# Altium PCB Analizador_PCB.PcbDoc (part 2 of 2)
Units mil, origin at the board's own origin, x right, y up, seen from the top; angles counter-clockwise.
Board outline 3920 x 3040 mil, 2 copper layers (Top Layer, Bottom Layer); 151 components, 106 nets, 476 pads, 730 vias.
Unrouted connection lines stored in the file: 111.
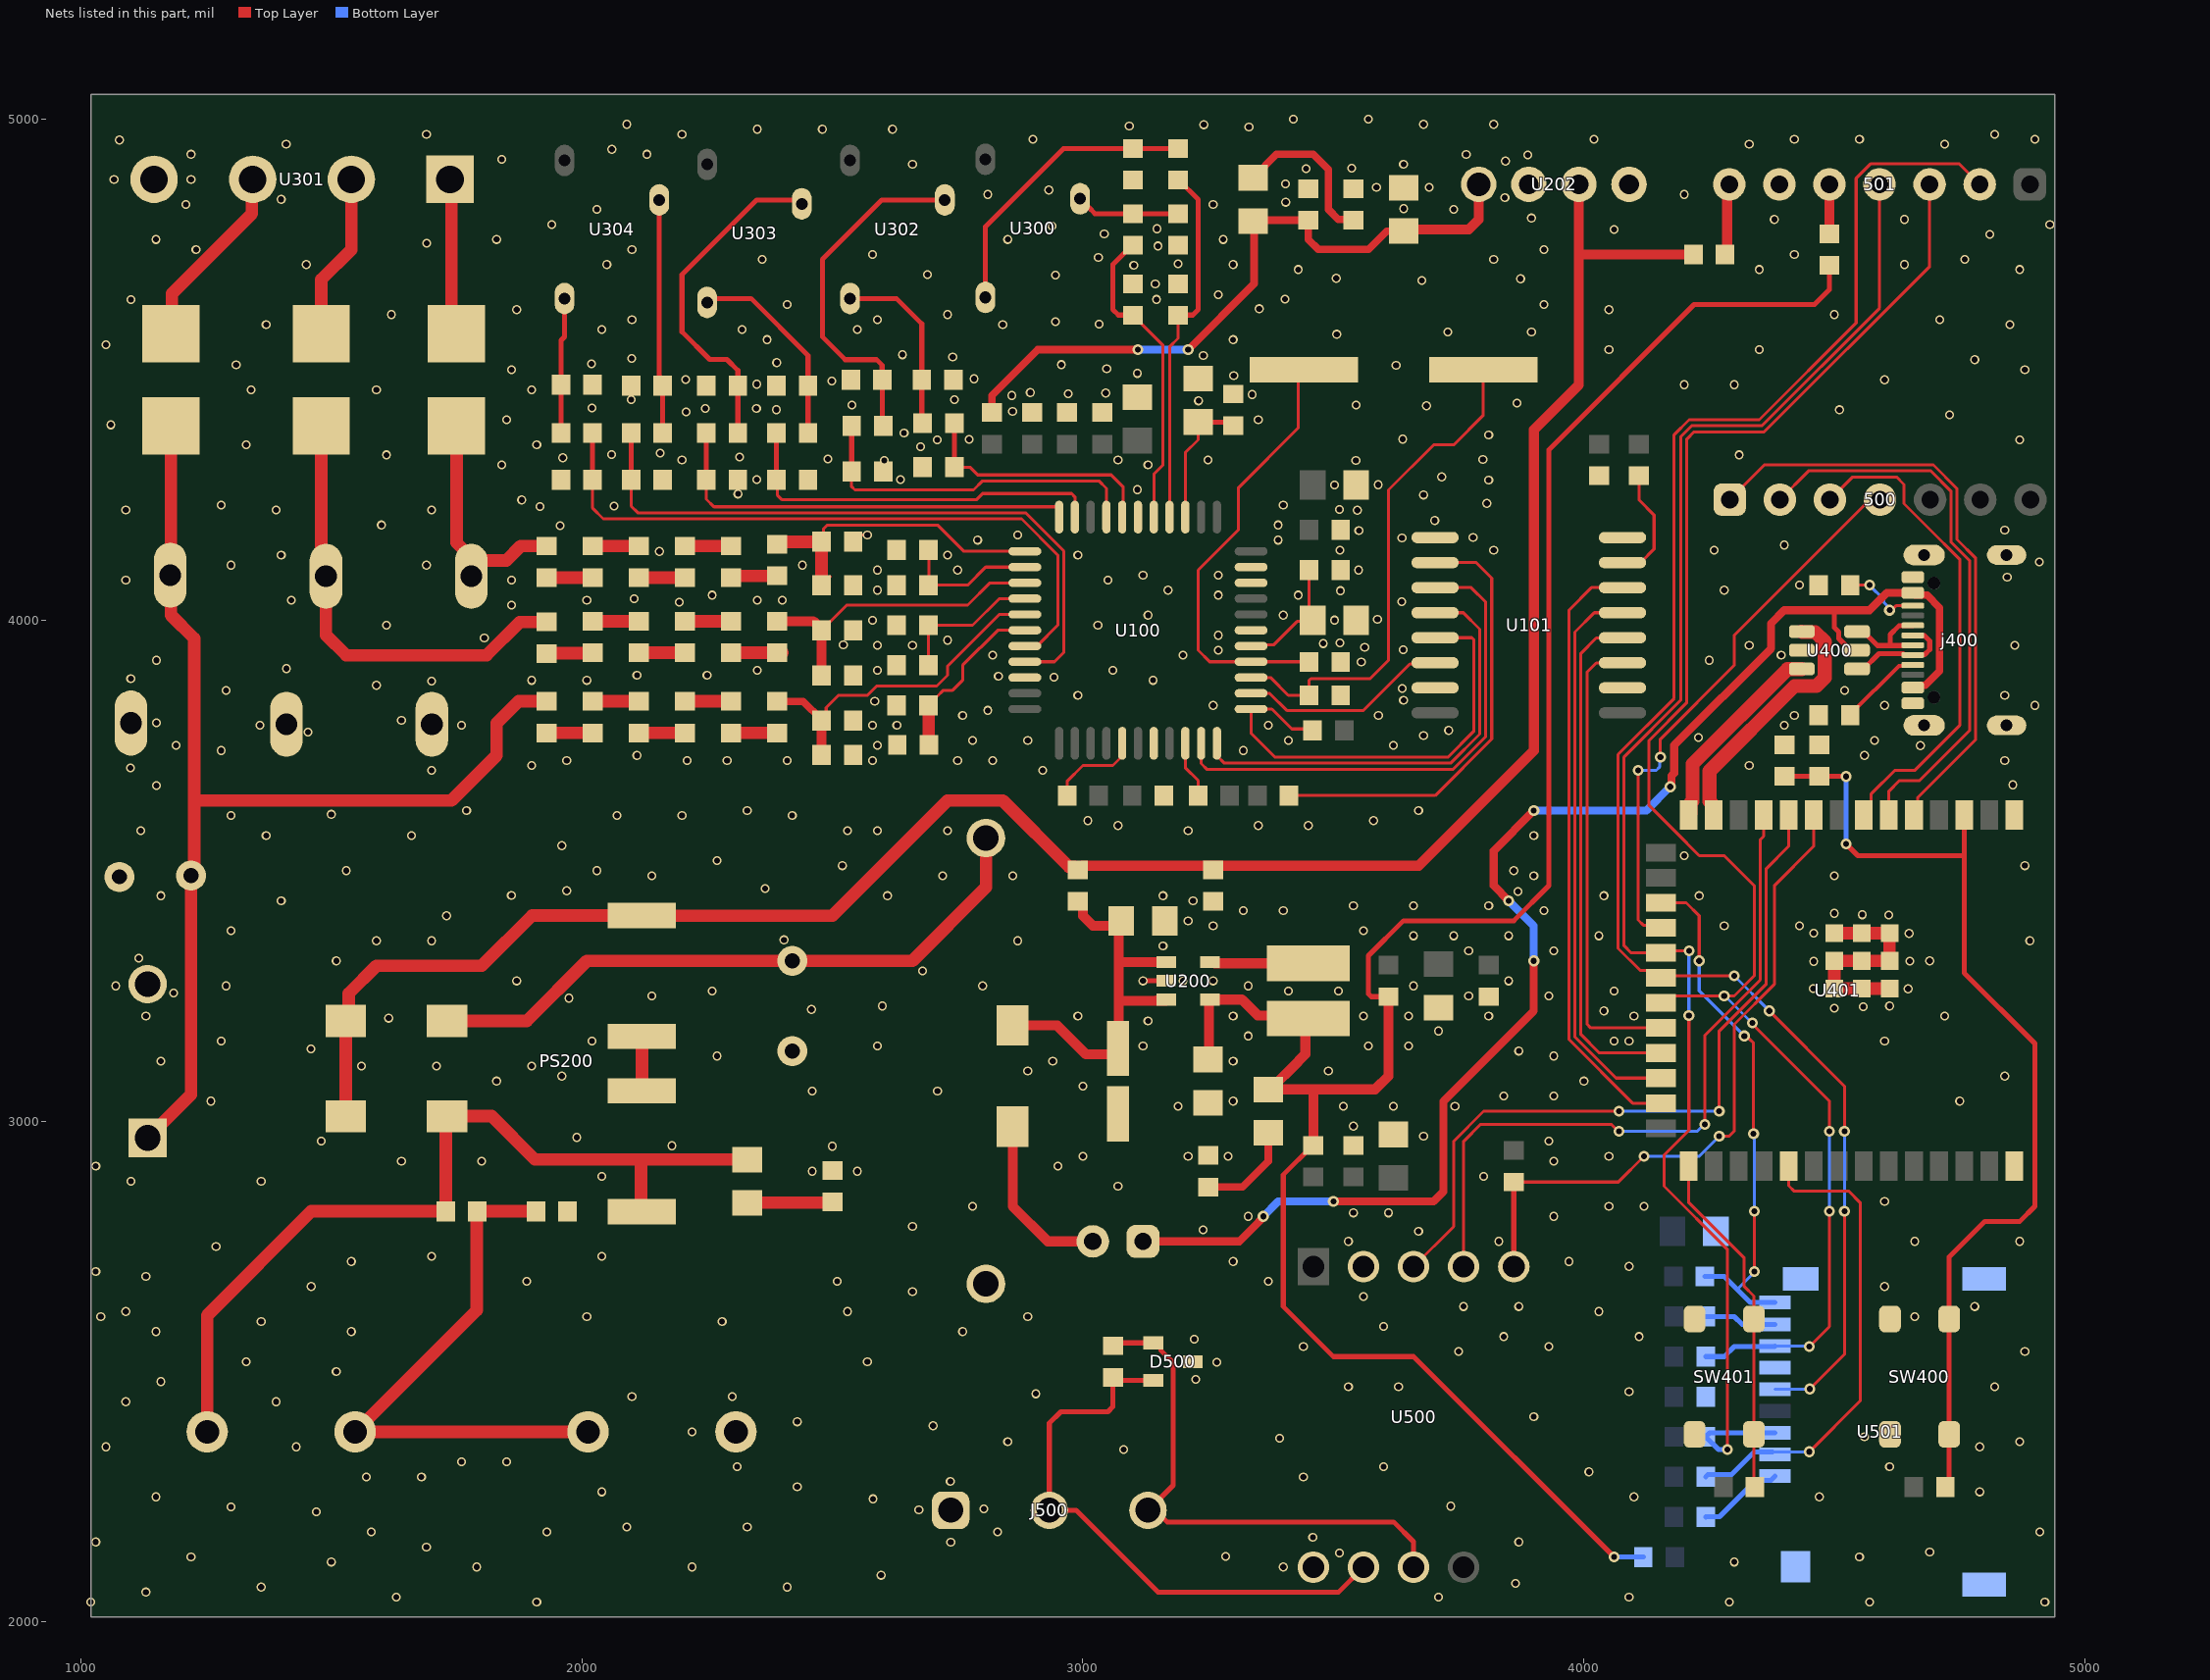
[diagram p2: the nets of this part, all layers, seen from the top]

## Via types
v1: diameter 18, hole 12, Top Layer to Bottom Layer, tented both sides, 675 vias
v2: diameter 22, hole 12, Top Layer to Bottom Layer, tented both sides, 55 vias

## Nets (pads, with @x,y where several pads share a name; then routed paths per layer and width w, separated by ;. In a path a pad name is that pad's centre, name@x,y a point inside that pad or via, vN(x,y) a via of type N, cw(c..) or ccw(c..) an arc to the next point about the centre after c; other vN are vias at no path point) (continued)
5V_USB: 200.1 j400.A4/B9 j400.B4/A9 U400.5 | length 2918.8
  Top Layer w10: 4500,4020 4500,3985.13 4508.53,3976.6 4508.53,3963.8 4532.32,3940.01 U400.5@4545.12,3940.01
  Top Layer w15: j400.A4/B9@4656.4,3865.51 4660.71,3869.82 4681.02,3869.82 4710,3898.8 4710,4025.05 4684.87,4050.18 4660.71,4050.18 j400.B4/A9@4656.4,4054.49
  Top Layer w16: 200.1@3120,2760 3312.53,2760 3353,2800.47 3353,2801.38 3360,2808.38 v2(3360,2810) ; v2(3500,2840) 3700,2840 3719.53,2859.53 3719.53,3039.53 3900,3220 v2(3900,3320) ; v2(3850,3440) 3820,3470 3820,3540 v2(3900,3620) ; v2(4172.24,3667.56) 4174.92,3670.23 4174.92,3689.48 4180,3694.56 4180,3750 4373.38,3943.38 4373.38,3993.38 4400,4020 4500,4020 4570,4020 4604.49,4054.49 j400.B4/A9@4656.4,4054.49
  Bottom Layer w16: v2(3360,2810) 3390,2840 v2(3500,2840) ; v2(3850,3440) 3900,3390 v2(3900,3320) ; v2(3900,3620) 4124.69,3620 v2(4172.24,3667.56)
A5: j400.A5 R401.1 | length 167.5
  Top Layer w8: R401.1@4531.5,3810 4531.5,3811.5 4628.88,3908.88 4654.49,3908.88 j400.A5@4656.4,3910.79
AGND: C100.1 C101.1 C102.1 C103.1 C104.1 C105.1 C106.1 C107.1 C108.1 C109.1 C110.1 C111.1 C112.1 C209.1 C300.1 C301.2 C302.1 C303.2 C304.1 C305.2 C306.1 C307.2 C308.1 C309.1 C310.2 C311.2 C312.1 C313.2 pad.3@1076.94,3487.67 PS200.2 R203.1 R204.1 R301.1 R302.2 R310.1 R312.2 R313.1 R320.1 R321.2 R323.2 R325.1 R332.1 R333.2 R335.2 R337.1 R338.2 RV300.2 RV301.2 RV302.2 U100.6 U100.20 U100.29 U100.39 U100.42 U100.43 U101.9 U101.15 U202.3 U301.4 | length 34.1
  Top Layer w6: R310.1@2541.5,4156.5 2555,4170 v1(2570,4170)
  other v1: 1100,2880 1030,2910 1260,3040 1160,3120 1280,3160 1130,3210 1185.55,3255.55 1070,3270 1290,3270 1115.55,3325.55 1300,3380 1400,3440 1160,3450 1530,3500 1370,3570 1660,3570 1120,3580 3210,3580 3070,3590 3350,3590 3450,3590 3010,3600 3580,3600 1300,3610 1500,3612.5 1770,3620 3670,3620 1151.24,3670 1700,3700 2920,3700 1099.12,3704.9 1900,3710 1970,3720 2210,3720 2290,3720 2410,3720 2580,3720 2750,3720 2820,3720 2110,3730 1280,3740 3320,3740 1190,3750 2590,3750 3620,3750 2780,3760 2890,3760 3410,3760 3680,3770 1453.41,3776.44 3730,3780 1357.47,3790.07 1760,3790 2580,3790 2628.83,3790.43 3370,3790 1151.24,3795.07 1640,3800 2760,3810 3590,3810 2810,3820 3260,3830 2584.73,3838.31 3640,3840 2990,3850 1290,3860 3637.37,3863.72 1590,3870 1700.03,3878.48 1900,3880 2010,3880 3140,3880 1099.81,3883.52 2942.31,3886.26 2831.42,3888.05 2110,3890 2250,3890 2350,3900 2590,3900 3060,3900 1410.71,3903.32 3555.71,3916.63 1151.24,3920 2820,3930 3200,3930 3270,3940 3639.06,3940.74 3562.61,3945.78 2590,3950 2660,3950 2522.05,3950.99 3479.81,3953.4 3513.15,3954.67 2730,3960 1805.55,3964.45 3270,3970 1610,3990 3030,3990 2580,4000 3502.13,4000.11 3587.98,4001.5 3130,4010 3400,4010 1860,4030 2194.4,4036.15 3636.47,4036.81 1420,4040 2010,4040 2350,4040 2400,4040 2104.33,4042.88 2260,4050 3270,4050 3430,4050 3514.15,4058.81 2590,4060 3170,4060 1090,4080 1860,4080 3050,4080 3120,4090 3270,4090 2590,4100 2750,4100 3550,4100 1300,4110 1690,4110 2440,4110 1400,4130 2730,4130 2990,4130 2154.79,4137.31 3513.34,4139.68 3820,4140 2790,4160 3390,4160 3636.92,4164.03 3778.73,4165.36 2870,4170 3550.87,4179.01 1956.9,4188.63 1600,4190 3390,4190 3702.32,4199.07 3547.88,4219.41 1090,4220 1390,4220 1700,4220 3512.14,4220.95 1916.48,4226.77 2064.22,4228 1280,4230 3400,4230 3806.1,4233.27 1880,4240 3680,4250 2311.65,4252 3109.02,4260.62 3502.47,4269.88 3589.27,4270.42 3810,4280 2349.45,4280.7 2636.28,4280.72 3716.09,4286.06 1840,4310 3130,4310 2603.85,4318.78 3544.94,4319.03 2200,4320 3070,4320 3250,4320 3798.31,4320.68 2491.34,4321.76 1962.02,4324.3 2314.64,4325.68 1610,4330 2059.61,4330.92 2156.49,4333.78 2676.13,4346.04 1330,4350 1910,4350 2709.21,4359.69 2773.13,4361.07 3638.2,4361.35 3810,4370 2643.18,4373.64 1060,4390 1850,4400 3350,4400 2208.19,4415.64 2859.62,4416.57 2388.32,4420.16 2246.61,4422.42 2020.37,4423.36 2348.54,4422.87 3685.8,4427.99 2539.17,4429.24 3545.6,4429.73 3866.68,4433.19 3230.79,4437.96 2098.55,4440.15 2743.53,4440.48 2858.39,4448.55 3337.72,4450.55 2970.79,4452.26 3045.63,4453.49 2895.03,4454.42 1340,4460 1590,4460 1900,4460 2348.99,4471.01 2499.16,4477.25 2207.42,4480.45 2782.55,4481.74 3301.17,4488.34 3109.03,4492.77 1860,4500 3047.49,4502.04 3625.22,4508.48 1310,4510 2957.19,4510.09 2019.23,4511.89 2389,4514.18 2099.34,4522.7 2740.18,4525.22 3240.42,4528.34 2640,4530 1050,4550 2370,4560 3300,4560 3506.65,4570.79 3728.21,4575.12 3895.24,4575.12 2040,4580 2320,4580 2550,4580 1370,4590 2840,4590 3032.73,4590.92 2945.34,4596.06 2100,4600 2590,4600 1620,4610 2730,4610 1870,4620 3351.99,4621.7 2410,4630 3920,4630 1100,4640 3147.17,4640.24 3403.34,4641.12 3270,4650 3144.53,4671.34 3676.28,4678.11 3505.79,4682.44 3873.6,4681.57 2945.34,4688.59 2690,4690 3430,4700 3101.57,4708.5 1450,4710 2050,4710 3300,4710 3189.86,4711.66 2360,4720 3820,4720 3031.01,4724 2580,4730 1230,4740 2100,4740 3920,4740 3149.8,4746.98 1690.3,4752.32 1150,4760 1830,4760 2850,4760 3280,4760 3042.7,4770.98 3147.96,4781.5 2938.49,4786.83 1940,4790 3895.24,4802.74 2030,4820 3740,4820 3640.05,4821.56 1210,4830 3260,4830 3404.77,4834.43 1400,4840 3842.29,4843.81 2810,4850 2932.2,4858.79 3586.06,4864.13 3691.43,4864.13 3404.39,4870.82 1066.39,4879.52 1220,4880 3445.24,4901.26 3536.45,4902.1 2660,4910 3640,4910 3843.3,4916.35 1840,4920 3888.17,4928.83 1220,4930 2130,4930 3765.09,4929.78 2060,4940 1410,4950 1077.13,4958.58 2900,4960 1690,4970 2200,4970 2350,4980 2480,4980 2620,4980 3331.49,4984.58 3092.58,4986.22 3241.33,4989.09 2090,4990 3680,4990 3820,4990 3420,5000 3570,5000
AVCC_3v3: C209.2 D203.1 FB100.2 R203.2 U202.4 | length 1366.3
  Top Layer w15: FB100.2@2818.5,4414.5 2818.5,4448.5 2910,4540 v2(3110,4540) ; v2(3210,4540) 3341.81,4671.81 3341.81,4798.5 R203.2@3450,4798.5 3450,4760 3470,4740 3570,4740 3606.76,4776.76 C209.2@3643.45,4776.76 ; C209.2@3646.69,4780 C209.2@3643.45,4776.76 ; C209.2@3653.45,4776.76 C209.2@3643.45,4776.76
  Top Layer w20: C209.2@3656.69,4780 3770,4780 3790,4800 U202.4@3790,4870
  Bottom Layer w15: v2(3110,4540) v2(3210,4540)
B5: j400.B5 R402.1 | length 155.6
  Top Layer w6: R402.1@4531.5,4070 v2(4570,4070) ; v2(4610,4020) 4614.33,4020 4623.78,4029.45 4655.85,4029.45 j400.B5@4656.4,4028.9
  Bottom Layer w6: v2(4570,4070) 4598.74,4041.26 4598.74,4035.59 4610,4024.33 v2(4610,4020)
BOOT: R403.1 SW401.2 U401.27 | length 697.7
  Top Layer w6: U401.27@4208.8,2910.6 4208.8,2838.17 4320,2726.97 4320,2670 4339.06,2650.94 SW401.2@4339.06,2605.16 SW401.2@4339.06,2374.84 4339.06,2277.56 R403.1@4331.5,2270
DGND: 501.6 C113.1 C200.1 C202.2 C203.2 C207.2 C208.1 C400.1 C401.1 C403.2 C404.1 C500.1 C501.1 C502.1 C503.1 j400.0 j400.A1/B12 j400.B1/A12 pad.5 PS200.3 R202.1 R205.1 R206.1 R401.2 R402.2 SW400.1 SW401.1 U101.2 U101.8 U200.2 U202.1 U400.2 U401.1 U401.40 U401.41 U500.2 U501.6 U501.10 | length 487.5
  Top Layer w10: v1(3120,3280) U200.2@3166.69,3280
  Top Layer w25: U401.41@4499.8,3375.1 U401.41@4554.9,3375.1 U401.41@4610,3375.1 U401.41@4610,3320 U401.41@4554.9,3320 U401.41@4499.8,3320 U401.41@4499.8,3264.9 U401.41@4554.9,3264.9 U401.41@4610,3264.9
  other v1: 1020,2040 1910,2040 4290,2040 4570,2040 4920,2040 1630,2050 4090,2050 1130,2060 1360,2070 2410,2070 1790,2110 2220,2110 1500,2120 4300,2120 1220,2130 4550,2130 4690,2140 1690,2150 1030,2160 1580,2180 1930,2180 4910,2180 2090,2190 2330,2190 1470,2220 1300,2230 1150,2250 4100,2250 4470,2250 2040,2260 4790,2260 2430,2270 1570,2290 1680,2290 4010,2300 2310,2310 4610,2310 1760,2320 1850,2320 1050,2350 1430,2350 4790,2350 4870,2360 4560,2370 2220,2380 2430,2400 3900,2410 1090,2440 1390,2440 2100,2450 2300,2450 4090,2460 3530,2470 3630,2470 4820,2470 1160,2480 1510,2500 1330,2520 2570,2520 3750,2540 4880,2540 3440,2550 3930,2550 3840,2570 4110,2570 1150,2580 1540,2580 2760,2580 3600,2590 1360,2600 2280,2600 1040,2610 2010,2610 2890,2610 4660,2610 1090,2620 2530,2620 4030,2620 3760,2630 3870,2630 4780,2630 3560,2650 2660,2660 1460,2670 4600,2670 1890,2680 2510,2680 3370,2680 1130,2690 1030,2700 4090,2710 1540,2720 3300,2720 3970,2720 1700,2730 2040,2730 1270,2750 3530,2760 3830,2760 4660,2760 4870,2760 3670,2780 3240,2783 2660,2790 3330,2810 3940,2810 3540,2817 3610,2817 2780,2830 4050,2830 4120,2830 4600,2840 3070,2870 1360,2880 2040,2890 3800,2890 2460,2900 2550,2900 2950,2910 1640,2920 1800,2920 3940,2920 3000,2930 3210,2930 3290,2930 4050,2930 2500,2950 2179.93,2950.81 1480,2960 3930,2960 1990,2967.5 3680,2970 3540,2990 3190,3030 3520,3030 3620,3030 3742.53,3030 3300,3040 4750,3040 3840,3050 3940,3050 2460,3060 2710,3060 3000,3070 1830,3080 4000,3080 1960,3090 4840,3090 2890,3100 3490,3100 1560,3110 1710,3110 1900,3110 2940,3120 3300,3120 2270,3130 3940,3130 3870,3140 1459.69,3144.09 2590,3150 3120,3150 3570,3150 3650,3150 2020,3160 4060,3160 4090,3160 4600,3160 3330,3170 3710,3180 3130,3200 1614.45,3205.55 2990,3210 3300,3210 3560,3210 3650,3210 3810,3210 4100,3210 4720,3210 4040,3220 2458.32,3223.03 4499.72,3225.36 4557.67,3228.18 2600,3230 4610,3230 1974.45,3245.55 2140,3250 3770,3250 3930,3250 2260,3260 3410,3260 3510,3260 4060,3260 4646.93,3264.19 4457.75,3264.82 2800,3270 3330,3270 3660,3270 1870,3280 3200,3280 3260,3280 3850,3280 2680,3300 4458.69,3319.01 1510,3320 4650.38,3319.63 4690,3320 3770,3340 3940,3340 3160,3350 1590,3360 1700,3360 2870,3360 4890,3360 2403.51,3361.87 3660,3370 3740,3370 3850,3370 4030,3370 4458.69,3375.07 4649.12,3374.76 3560,3380 3260,3390 4280,3390 4430,3390 3210,3400 1730,3410 4555.37,3412.1 4608.41,3411.71 4499.72,3414.85 3320,3420 3400,3420 3920,3420 3540,3430 3660,3430 3810,3430 3220,3440 2610,3450 3160,3450 4040,3450 4230,3450 1859.45,3450.55 3868.38,3458.38 1970,3460 2365.55,3464.45 2140,3490 2720,3490 2860,3490 3900,3490 4500,3490 2030,3500 3860,3500 2520,3510 4880,3510 2270,3520 4200,3530 1960,3550 3900,3570 2530,3580 2590,3580 2730,3580 2070,3610 2200,3610 2420,3610 2330,3620 4856.25,3671.39 4330,3710 4840,3720 4560,3730 4671.49,3749.76 4580,3760 4228.58,3765.97 4400,3790 4420,3810 4600,3830 4900,3830 4840,3850 4520,3860 4250,3920 4393.68,3930.12 4330,3950 4860,3950 4280,4060 4430,4070 4844.78,4086.08 4908.95,4116.05 4260,4140 4400,4150 4840,4180 4310,4330 4870,4360 4730,4410 4510,4420 4200,4470 4300,4470 4600,4480 4880,4500 4780,4520 4050,4540 4350,4540 4850,4590 4710,4600 4500,4610 4050,4620 4350,4700 4870,4700 4640,4710 4760,4720 4420,4730 4810,4770 4060,4780 4930,4790 4380,4800 4640,4800 4200,4850 4330,4950 4720,4950 4020,4960 4420,4960 4550,4960 4900,4960 4820,4970
DVCC_3v3: C200.2 D204.1 FB400.2 FB500.2 FB501.2 FB503.1 L200.2 U200.4 | length 4432.3
  Top Layer w10: FB500.2@3460,2951.5 3458.5,2951.5 3400,2893 3400,2630 3500,2530 3660,2530 v2(4060,2130) ; FB400.2@3610,3248.5 3575.86,3248.5 3570,3254.36 3570,3330 3640,3400 3860,3400 3930,3470 3930,4340 4220,4630 4460,4630 4490,4660 FB503.1@4490,4708.5
  Top Layer w20: C200.2@3250,3123.31 3251.66,3124.96 3251.66,3240.94 U200.4@3253.31,3242.6 3317.4,3242.6 3349.02,3210.98 3443.92,3210.98 3443.92,3133.92 3430,3120 3430,3119.37 D204.1@3373.94,3063.31 ; D204.1@3370,3063.31 3460,3063.31 ; FB500.2@3460,2951.5 3460,3063.31 ; FB400.2@3610,3238.5 3610,3090 3583.31,3063.31 3460,3063.31
  Bottom Layer w10: v2(4060,2130) FB501.2@4118.5,2130
EN: C403.1 C404.2 R400.1 SW400.2 U401.3 | length 2018
  Top Layer w10: C403.1@4400,3688.5 C404.2@4470,3688.5 4522.89,3688.5 v2(4523.27,3688.12) ; v2(4523.17,3553.51) 4546.68,3530 4758.8,3530 ; R400.1@4721.5,2270 4729.06,2277.56 SW400.2@4729.06,2374.84 SW400.2@4729.06,2605.16 4729.06,2729.06 4800,2800 4870,2800 4900,2830 4900,3154.82 4758.8,3296.02 4758.8,3530 ; 4758.8,3553.51 4758.8,3530 ; 4758.8,3553.74 U401.3@4758.8,3611.4
  Bottom Layer w10: v2(4523.17,3553.51) 4523.27,3553.6 v2(4523.27,3688.12)
L1_120VAC: F300.2 R303.2 RV300.1 | length 482.6
  Top Layer w25: F300.2@1750,4388.3 1750,4154.74 1779.37,4125.37 RV300.1@1779.37,4100.89 ; RV300.1@1779.37,4087.64 RV300.1@1779.37,4100.89 ; R303.2@1929.63,4148 1878,4148 1849.35,4119.35 1797.83,4119.35 RV300.1@1779.37,4100.89
L2_120VAC: F301.2 R314.2 RV301.1 | length 874.5
  Top Layer w25: F301.2@1480,4356.6 1480,4140.3 1489.37,4130.93 1489.37,3970.63 1530,3930 1810,3930 1876.5,3996.5 R314.2@1929.63,3996.5
L3_120VAC: F302.2 pad.3@1220,3490 PS200.1 R326.2 RV302.1 | length 2301.5
  Top Layer w25: PS200.1@1133.39,2966.46 1220,3053.07 pad.3@1220,3490 1226.7,3496.7 1226.7,3640 ; RV302.1@1178.74,4090 1180.09,4088.65 1180.09,4009.91 1226.7,3963.3 1226.7,3640 ; RV302.1@1180,4091.26 F302.2@1180,4388.3 ; R326.2@1929.63,3838 1874,3838 1830,3794 1830,3730 1740,3640 1226.7,3640
Net200_2: 200.2 D202.2 | length 348
  Top Layer w20: D202.2@2860,2989 2860,2830 2930,2760 200.2@3020,2760
Net500_1: 500.1 U401.5 | length 1219.8
  Top Layer w6: 500.1@4291,4240.72 4360.28,4310 4697.38,4310 4744.5,4262.88 4744.5,4161.18 4782,4123.68 4782,3762 4666.44,3646.44 4666.44,3619.04 U401.5@4658.8,3611.4
Net500_2: 500.2 U401.6 | length 1134.1
  Top Layer w6: 500.2@4391,4240.72 4448.28,4298 4692.41,4298 4732.5,4257.91 4732.5,4156.21 4770,4118.71 4770,3780 4670,3680 4630,3680 4608.8,3658.8 U401.6@4608.8,3611.4
Net500_3: 500.3 U401.7 | length 981.2
  Top Layer w6: 500.3@4491,4240.72 4536.28,4286 4624,4286 4638.91,4271.09 4638.91,4232.83 4685.87,4185.87 4750,4121.74 4750,3790 4660,3700 4620,3700 4573.5,3653.5 4573.5,3626.1 U401.7@4558.8,3611.4
Net500_4: 500.4 U401.18 | length 1124.1
  Top Layer w6: v2(4108.31,3700.35) 4108.31,3401.69 4118.66,3391.34 4148.36,3391.34 U401.18@4153.7,3386 ; v2(4152.65,3726.86) 4152.65,3762.65 4300,3910 4300,3970 4559.43,4229.43 4579.71,4229.43 500.4@4591,4240.72
  Bottom Layer w6: v2(4108.31,3700.35) 4108.49,3700.18 4144.33,3700.18 4151.01,3706.86 4151.01,3725.22 v2(4152.65,3726.86)
Net501_5: 501.5 FB503.2 | length 98.5
  Top Layer w20: FB503.2@4490,4771.5 501.5@4490,4870
Net501_7: 501.7 FB502.2 | length 143.5
  Top Layer w20: FB502.2@4281.5,4730 4285.75,4734.25 4285.75,4865.75 501.7@4290,4870
NetC201_1: C201.1 D201.2 D205.1 R200.2 R207.1 | length 1729.9
  Top Layer w25: C201.1@1252.3,2380 1252.3,2612.3 1460,2820 R200.2@1728.5,2820 1728.5,3007.5 D201.2@1731,3010 1820,3010 1906.69,2923.31 2118.35,2923.31 ; R207.1@2131.1,2819.2 2118.35,2831.95 2118.35,2923.31 ; D205.1@2330,2923.31 2118.35,2923.31
NetC201_2: C201.2 C202.1 R200.1 R202.2 | length 1125.3
  Top Layer w25: R200.1@1790,2823.17 1790,2622.4 C201.2@1547.6,2380 C202.1@2012.3,2380 ; R200.1@1791.5,2820 R202.2@1908.5,2820
NetC207_1: C207.1 C208.2 D202.1 FB202.1 U200.1 U200.3 | length 808.9
  Top Layer w20: D202.1@2860,3191 2949,3191 3006.7,3133.3 3071.65,3133.3 3071.65,3240 ; FB202.1@2990,3438.5 2991.5,3438.5 3000,3430 3000,3410 3020,3390 C208.2@3071.65,3390 ; C208.2@3071.65,3394.96 3071.65,3317.4 ; U200.3@3166.69,3242.61 3164.88,3240.79 3147.53,3240.79 3146.73,3240 3071.65,3240 ; U200.1@3166.69,3317.4 3071.65,3317.4 ; 3071.65,3240 3071.65,3317.4
  Top Layer w25: C208.2@3071.65,3394.96 C208.2@3076.69,3400
NetC300_2: C300.2 R300.1 U100.4 | length 730.5
  Top Layer w6: U100.4@3173,4205.8 3173,4545.5 3190,4562.5 C300.2@3190,4608.5
  Top Layer w10: C300.2@3190,4608.5 3190.64,4609.14 3219.14,4609.14 3230,4620 3230,4840 3191.5,4878.5 R300.1@3190,4878.5
NetC301_1: C301.1 R309.1 U100.5 | length 626.8
  Top Layer w6: C301.1@3100,4608.5 3101.5,4608.5 3117,4593 3117,4591.5 3160,4548.5 3160,4310 3142.15,4292.15 3142.15,4206.45 U100.5@3141.5,4205.8
  Top Layer w10: C301.1@3100,4608.5 3099.36,4609.14 3070.86,4609.14 3060,4620 3060,4710 3085,4735 3098.5,4748.5 R309.1@3100,4748.5
NetC302_2: C302.2 R308.1 R310.2 U100.12 | length 654.7
  Top Layer w6: C302.2@2478.5,4070 2478.5,4071.5 2494,4087 C302.2@2495.5,4087 ; R310.2@2478.5,4156.5 2481.99,4159.99 2481.99,4181.99 2490,4190 2710,4190 2762.5,4137.5 U100.12@2884.2,4137.5
  Top Layer w25: R308.1@2390,4151.5 2395,4156.5 R310.2@2478.5,4156.5 C302.2@2478.5,4071.5
NetC303_1: C303.1 R312.1 U100.13 | length 294.6
  Top Layer w6: R312.1@2692.61,4156.5 2692.61,4071.11 C303.1@2691.5,4070 2770,4070 2806,4106 U100.13@2884.2,4106
NetC304_2: C304.2 R311.1 U100.7 | length 501.8
  Top Layer w6: C304.2@2743.38,4305.51 2774.49,4305.51 2790,4290 3056.49,4290 3080,4266.49 3080,4207.3 U100.7@3078.5,4205.8
  Top Layer w10: C304.2@2743.38,4305.51 R311.1@2743.38,4393.25
NetC305_1: C305.1 R322.1 U100.8 | length 703.9
  Top Layer w6: C305.1@2538.5,4296.65 2538.5,4266.29 2544.79,4260 2781.86,4260 2799.86,4278 3032,4278 3047,4263 U100.8@3047,4205.8
  Top Layer w10: C305.1@2538.5,4296.65 R322.1@2538.5,4388.17
NetC306_2: C306.2 R319.1 R320.2 U100.14 | length 629.6
  Top Layer w6: R320.2@2478.5,3981.5 2494,3997 2495.5,3997 2528.5,4030 2770,4030 2814.5,4074.5 U100.14@2884.2,4074.5
  Top Layer w20: R319.1@2390,3998 2462,3998 R320.2@2478.5,3981.5 ; C306.2@2478.5,3890 R320.2@2478.5,3980
NetC307_1: C307.1 R323.1 U100.15 | length 294.7
  Top Layer w6: R323.1@2691.5,3910 C307.1@2691.5,3990 2780,3990 2833,4043 U100.15@2884.2,4043
NetC308_2: C308.2 R324.1 U100.10 | length 770.7
  Top Layer w6: C308.2@2388.5,4280 2390,4278.5 2390,4250 2399.68,4240.32 2787.29,4240.32 2799.72,4252.75 2977.54,4252.75 2984.1,4246.19 U100.10@2984.1,4205.8
  Top Layer w10: C308.2@2388.5,4280 R324.1@2388.5,4373.68
NetC309_2: C309.2 R331.1 R332.2 U100.16 | length 685
  Top Layer w6: R332.2@2478.5,3801.5 2487.66,3810.66 2487.66,3825.49 2512.18,3850 2570,3850 2588.43,3868.43 2708.43,3868.43 2730,3890 2730,3908.38 2833.12,4011.5 U100.16@2884.2,4011.5
  Top Layer w15: R331.1@2390,3838 2442,3838 R332.2@2478.5,3801.5
  Top Layer w20: C309.2@2478.5,3730.71 R332.2@2478.5,3800
NetC310_1: C310.1 R334.1 U100.11 | length 858.9
  Top Layer w6: C310.1@2248.5,4280 2248.5,4241.5 2263.65,4226.35 2947.75,4226.35 2952.6,4221.5 U100.11@2952.6,4205.8
  Top Layer w10: C310.1@2248.5,4281.38 R334.1@2248.5,4373.68
NetC311_1: C311.1 R335.1 U100.17 | length 352.6
  Top Layer w6: R335.1@2691.5,3830 2691.5,3831.5 2707,3847 2708.5,3847 2721.5,3860 2740,3860 2760,3880 2760,3910 2830,3980 U100.17@2884.2,3980
  Top Layer w25: R335.1@2691.5,3830 2692.06,3829.44 2692.06,3751.7 C311.1@2692.61,3751.14
NetC312_2: C312.2 R336.1 U100.18 | length 1340.4
  Top Layer w6: C312.2@2021.5,4280 2021.5,4223.51 2042.67,4202.35 2877.65,4202.35 2950,4130 2950,3990 2908.5,3948.5 U100.18@2884.2,3948.5
  Top Layer w10: C312.2@2021.5,4280 R336.1@2021.5,4373.68
NetC313_1: C313.1 R339.1 U100.19 | length 1334.7
  Top Layer w6: C313.1@2098.5,4280 2098.5,4227.51 2111.67,4214.35 2885.65,4214.35 2962,4138 2962,3935.51 2943.49,3917 U100.19@2884.2,3917
  Top Layer w10: C313.1@2098.5,4280 R339.1@2098.5,4373.68
NetD203_2: D203.2 R204.2 | length 319.4
  Top Layer w15: D203.2@3340.9,4884.21 3386.69,4930 3460,4930 3490,4900 3490,4820 3510,4800 3538.5,4800 R204.2@3540,4798.5
NetD204_2: D204.2 R205.2 | length 198
  Top Layer w15: R205.2@3250,2868.5 3318.5,2868.5 3370,2920 D204.2@3370,2976.69
NetD205_2: D205.2 R206.2 | length 170.7
  Top Layer w25: D205.2@2330,2836.69 2330.9,2837.6 2499.1,2837.6 R206.2@2500,2838.5
NetD500_1: D500.1 J500.3 R501.2 U500.8 | length 1065.1
  Top Layer w10: R501.2@3060,2551.5 3065.9,2557.4 D500.1@3140.7,2557.4 3147.6,2557.4 3155.4,2549.6 3155.4,2542.7 3180,2518.1 3180,2273.3 J500.3@3129.9,2223.2 3144.96,2223.2 3168.16,2200 3620,2200 3659.76,2160.24 3659.76,2109.84 U500.8@3660,2109.6
NetD500_2: D500.2 J500.2 R501.1 U500.9 | length 1171.3
  Top Layer w10: D500.2@3140.7,2482.6 3065.9,2482.6 R501.1@3060,2488.5 3060,2430 3050,2420 2955.86,2420 2933.05,2397.19 J500.2@2933.05,2223.2 2986.8,2223.2 3150,2060 3510.4,2060 U500.9@3560,2109.6
NetF300_1: F300.1 U301.1 | length 310
  Top Layer w25: F300.1@1740,4570 U301.1@1740,4880
NetF301_1: F301.1 U301.2 | length 344.9
  Top Layer w25: F301.1@1480,4560 F301.1@1480,4571.7 1480,4680 1540,4740 U301.2@1540,4880
NetF302_1: F302.1 U301.3 | length 355.9
  Top Layer w25: F302.1@1180,4571.7 1181.86,4573.56 1181.86,4651.86 1341.67,4811.67 1341.67,4858.47 U301.3@1343.2,4860
NetL200_1: L200.1 U200.5 | length 197.6
  Top Layer w20: U200.5@3253.31,3317.41 3261.18,3317.41 3263.49,3315.1 L200.1@3450,3315.1
NetR100_1: R100.1 U101.10 | length 898.2
  Top Layer w6: R100.1@3411.5,3650 3703.13,3650 3816,3762.87 3816,4084 3785,4115 U101.10@3703,4115
NetR101_1: R101.1 U101.7 | length 233.1
  Top Layer w6: U101.7@4077,4115 4112.95,4115 4140,4142.05 4140,4210 4110,4240 R101.1@4110,4288.5
NetR102_2: R102.2 U100.31 | length 114.8
  Top Layer w6: U100.31@3204.5,3754.2 3204.5,3705.5 3230,3680 R102.2@3230,3650
NetR103_1: R103.1 U100.27 | length 184.9
  Top Layer w6: R103.1@2968.5,3650 2968.5,3678.5 3000,3710 3060,3710 3078.5,3728.5 U100.27@3078.5,3754.2
NetR201_1: R201.1 R207.2 | length 108.5
  Top Layer w25: R207.2@2120,3060.7 R201.1@2120,3169.2
NetR300_2: R300.2 R301.2 U300.4 | length 590.2
  Top Layer w10: U300.4@2805.5,4644.4 2805.5,4785.5 2961.5,4941.5 R301.2@3100,4941.5 R300.2@3190,4941.5
NetR302_1: R302.1 R309.2 U300.2 | length 210.1
  Top Layer w10: U300.2@2994.5,4841.2 2994.5,4837.36 3008.08,4823.77 3011.93,4823.77 3024.2,4811.5 R309.2@3100,4811.5 R302.1@3190,4811.5
NetR303_1: R303.1 R304.2 | length 66.6
  Top Layer w25: 1951.11,4085 R304.2@2017.72,4085
NetR304_1: R304.1 R305.2 | length 85.7
  Top Layer w25: R304.1@2022,4148 R305.2@2107.7,4148
NetR305_1: R305.1 R306.2 | length 77.4
  Top Layer w25: R305.1@2115,4085 2192.1,4085 R306.2@2192.28,4084.82
NetR306_1: R306.1 R307.2 | length 80.2
  Top Layer w25: R306.1@2199.78,4148 R307.2@2280,4148
NetR307_1: R307.1 R308.2 | length 95
  Top Layer w25: R307.1@2296.42,4085 2299.92,4088.5 R308.2@2390,4088.5
NetR311_2: R311.2 R313.2 U302.4 | length 365.5
  Top Layer w10: U302.4@2535.5,4642.2 2627.8,4642.2 2678.5,4591.5 R313.2@2678.5,4480 R311.2@2678.5,4390
NetR314_1: R314.1 R315.2 | length 65.9
  Top Layer w25: 1951.86,3934.25 R315.2@2017.72,3934.25
NetR315_1: R315.1 R316.2 | length 91.5
  Top Layer w25: R315.1@2017.72,3998 R316.2@2109.18,3998
NetR316_1: R316.1 R317.2 | length 91
  Top Layer w25: R316.1@2109.18,3935 R317.2@2200.16,3935
NetR317_1: R317.1 R318.2 | length 96.3
  Top Layer w25: R317.1@2200.16,3998 R318.2@2296.42,3998
NetR318_1: R318.1 R319.2 | length 103.6
  Top Layer w25: R318.1@2296.42,3935 R319.2@2400,3935
NetR321_1: R321.1 R322.2 U302.2 | length 712.6
  Top Layer w10: R322.2@2601.5,4388.17 2600.02,4389.65 R321.1@2600.02,4480 2599.24,4480.78 2599.24,4509.14 2588.38,4520 2525.86,4520 2480,4565.86 2480,4720 2599,4839 U302.2@2724.5,4839
NetR324_2: R324.2 R325.2 U303.4 | length 381.6
  Top Layer w10: U303.4@2265.5,4642.2 2337.8,4642.2 2451.5,4528.5 R325.2@2451.5,4467.93 R324.2@2451.5,4380
NetR326_1: R326.1 R327.2 | length 92.1
  Top Layer w25: R326.1@1929.63,3775 R327.2@2021.7,3775
NetR327_1: R327.1 R328.2 | length 88.3
  Top Layer w25: R327.1@2021.7,3838 R328.2@2110,3838
NetR328_1: R328.1 R329.2 | length 92.1
  Top Layer w25: R328.1@2113.78,3775 R329.2@2205.85,3775
NetR329_1: R329.1 R330.2 | length 92.1
  Top Layer w25: R329.1@2205.85,3838 R330.2@2297.93,3838
NetR330_1: R330.1 R331.2 | length 92.1
  Top Layer w25: R330.1@2297.93,3775 R331.2@2390,3775
NetR333_1: R333.1 R334.2 U303.2 | length 686.4
  Top Layer w10: R334.2@2311.5,4373.68 R333.1@2311.5,4467.93 2311.5,4498.5 2289.57,4520.43 2255.43,4520.43 2200,4575.86 2200,4690 2349,4839 2431.2,4839 U303.2@2439,4831.2
NetR336_2: R336.2 R337.2 U304.4 | length 271.4
  Top Layer w10: R336.2@1958.5,4373.68 R337.2@1958.5,4470 1958.5,4558.5 1965.5,4565.5 U304.4@1965.5,4642.2
NetR338_1: R338.1 R339.2 U304.2 | length 462.9
  Top Layer w10: U304.2@2154.5,4839 2154.5,4487 2161.5,4480 R339.2@2161.5,4379.02
NetR500_2: R500.2 U401.9 U500.5 | length 1348.7
  Top Layer w6: R500.2@3860,2878.5 4068.5,2878.5 v2(4120,2930) ; v2(4270,2970) 4290,2970 4300,2980 4300,3193.03 4380,3273.03 4380,3470 4458.8,3548.8 U401.9@4458.8,3611.4
  Top Layer w10: U500.5@3860,2709.6 3860,2877 R500.2@3861.5,2878.5
  Bottom Layer w6: v2(4120,2930) 4230,2930 v2(4270,2970)
NetR503_1: R503.1 U401.31 U501.2 | length 963.1
  Top Layer w6: U401.31@4408.8,2910.6 4408.8,2871.2 4420,2860 4528.93,2860 4551.26,2837.67 4551.26,2441.26 v2(4450,2340)
  Bottom Layer w6: U501.2@4376,2340 v2(4450,2340)
  Bottom Layer w10: R503.1@4243,2290 4247.78,2294.78 4294.78,2294.78 4340,2340 U501.2@4376,2340
NetR504_1: R504.1 U501.1 | length 172
  Bottom Layer w10: R504.1@4243,2210 4243.64,2210.64 4270.64,2210.64 4343.09,2283.09 4372.99,2283.09 U501.1@4381.3,2291.4
NetR506_2: R506.2 U501.8 | length 144.7
  Bottom Layer w10: R506.2@4243,2610 4300,2610 4315.5,2594.5 U501.8@4381.3,2594.5
NetR507_2: R507.2 U401.17 U501.9 | length 1056.8
  Top Layer w6: U401.17@4153.7,3436 4204,3436 4230,3410 v2(4230,3320) ; v2(4320,3170) 4324.33,3170 4334.1,3160.23 4334.27,3160.23 4338.51,3155.99 v2(4338.51,2974.85) ; v2(4340,2700) v2(4340,2820)
  Bottom Layer w6: v2(4230,3320) 4230,3260 v2(4320,3170) ; 4306.1,2663.9 4340,2697.8 v2(4340,2700) ; v2(4338.51,2974.85) 4340,2973.36 v2(4340,2820)
  Bottom Layer w10: R507.2@4241.5,2690 4280,2690 4306.1,2663.9 4332.2,2637.8 U501.9@4381.3,2637.8
NetU101_3: U101.3 U401.22 | length 931.9
  Top Layer w6: U101.3@4077,3915 4076.67,3914.67 4024.67,3914.67 4006,3896 4006,3194 4014,3186 U401.22@4153.7,3186
NetU101_4: U101.4 U401.23 | length 1031.9
  Top Layer w6: U101.4@4077,3965 4076.67,3964.67 4024.67,3964.67 3994,3934 3994,3173 4031,3136 U401.23@4153.7,3136
NetU101_5: U101.5 U401.24 | length 1124.9
  Top Layer w6: U101.5@4077,4015 4020.75,4015 3982,3976.25 3982,3168.03 4064.03,3086 U401.24@4153.7,3086
NetU101_6: U101.6 U401.25 | length 1218.9
  Top Layer w6: U101.6@4077,4065 4015,4065 3970,4020 3970,3163.06 4097.06,3036 U401.25@4153.7,3036
NetU401_10: U401.10 U500.3 | length 1487.3
  Top Layer w6: U500.3@3660,2709.6 3740,2789.6 3740,2960 3800,3020 v2(4070,3020) ; v2(4270,3020) 4270,3180 4364,3274 4364,3504 4408.8,3548.8 U401.10@4408.8,3611.4
  Bottom Layer w6: v2(4070,3020) v2(4270,3020)
NetU401_11: U401.11 U500.4 | length 1423.1
  Top Layer w6: U500.4@3760,2709.6 3760,2960 3793.36,2993.36 4055.08,2993.36 4068.44,2980 v2(4070,2980) ; v2(4241.32,2993.64) 4241.32,3171.32 4352,3282 4352,3562 4358.8,3568.8 U401.11@4358.8,3611.4
  Bottom Layer w6: v2(4070,2980) 4226.67,2980 4240.31,2993.64 v2(4241.32,2993.64)
REF: C110.2 C111.2 U100.3 | length 273.3
  Top Layer w6: U100.3@3204.5,4205.8 3204.5,4334.5 3230,4360 C110.2@3230,4395.59
  Top Layer w10: C110.2@3230,4395.59 3292.91,4395.59 C111.2@3300,4388.5
RGND: D500.3 J500.1 U500.10
  other v1: 3710.09,2050.02 3863.47,2077.09 2597.21,2093.57 3400,2110 3285.03,2131.22 3511.85,2137.96 2736.29,2159.81 3870,2160 3458.9,2169.27 2830,2180 2672.63,2224.16 2802.44,2226.04 3734.15,2231.47 2580.99,2245.98 2735.51,2280.77 3440,2290 3600,2310 3081.46,2344.34 2850,2360 3392.61,2366.92 2700.97,2391.91 2906.05,2455.75 3225.41,2484.38 3267.24,2518.89 3222.62,2564.55
SPI_CLK_H: 501.2 U401.20 U501.5 | length 3364.4
  Top Layer w6: v2(4300,3290) 4157.7,3290 U401.20@4153.7,3286 4139,3300.7 4112.33,3300.7 4068,3345.03 4068,3731.94 4180,3843.94 4180,4370 4210,4400 4350,4400 4543.27,4593.27 4543.27,4881.96 4572.81,4911.5 4748.5,4911.5 501.2@4790,4870 ; v2(4370,3220) 4520,3070 v2(4520,2980) ; v2(4450.93,2465.42) 4520,2534.49 v2(4520,2820)
  Bottom Layer w6: v2(4300,3290) v2(4370,3220) ; U501.5@4381.3,2464.6 4450.11,2464.6 v2(4450.93,2465.42) ; v2(4520,2820) v2(4520,2980)
SPI_CLK_RN: U100.33 U101.12 | length 891.4
  Top Layer w6: U100.33@3267.5,3754.2 3267.5,3729.6 3282.47,3714.63 3733.82,3714.63 3792,3772.81 3792,3982.25 3759.25,4015 U101.12@3703,4015
SPI_CS_RN: R104.1 U100.34 U101.13 | length 936
  Top Layer w6: R104.1@3458.5,3780 3455.57,3782.93 3417.07,3782.93 3377.4,3822.6 U100.34@3335.8,3822.6 3335.8,3774.2 3383.37,3726.63 3728.85,3726.63 3780,3777.78 3780,3961.49 3776.49,3965 U101.13@3703,3965
SPI_MISO_H: 501.3 R505.2 U401.21 U501.7 | length 3240.3
  Top Layer w6: U401.21@4153.7,3236 4167.7,3250 v2(4280,3250) 4300,3250 4340,3290 4340,3470.22 4280.22,3530 4230.22,3530 4182.1,3578.12 4130,3630.22 4130,3760 4205.51,3835.51 4205.51,4361.57 4219.94,4376 4359.94,4376 4690,4706.06 501.3@4690,4870 ; v2(4336.43,3196.2) 4336.43,3193.57 4490,3040 v2(4490,2980) ; v2(4450,2550) 4490,2590 v2(4490,2820)
  Bottom Layer w6: v2(4280,3250) 4281.31,3250 4335.12,3196.2 v2(4336.43,3196.2) ; U501.7@4381.3,2551.2 4448.8,2551.2 v2(4450,2550) ; v2(4490,2820) v2(4490,2980)
  Bottom Layer w10: R505.2@4243,2530 4280,2530 4300,2550 4380.1,2550 U501.7@4381.3,2551.2
SPI_MISO_RN: U100.32 U101.11 | length 1021.7
  Top Layer w6: U100.32@3236,3754.2 3236,3714 3248.06,3701.94 3738.1,3701.94 3804,3767.84 3804,4036 3775,4065 U101.11@3703,4065
SPI_MOSI_H: 501.4 R502.1 U401.19 U501.3 | length 3215.4
  Top Layer w6: v2(4209.55,3210.71) 4209.55,2981.88 4160,2932.32 4160,2870 4286.6,2743.4 v2(4286.6,2344.35) ; v2(4210,3340) 4157.7,3340 U401.19@4153.7,3336 4094,3336 4080,3350 4080,3726.97 4193.51,3840.49 4193.51,4366.54 4214.97,4388 4354.97,4388 4590,4623.03 501.4@4590,4870
  Bottom Layer w6: v2(4209.55,3210.71) 4209.55,3339.55 v2(4210,3340)
  Bottom Layer w10: v2(4286.6,2344.35) 4268.65,2344.35 R502.1@4243,2370 4251,2378 U501.3@4381.3,2378
SPI_MOSI_RN: U100.35 U101.14 | length 420.7
  Top Layer w6: U100.35@3335.8,3854.1 3372.87,3854.1 3406.97,3820 3560,3820 3652.67,3912.67 3700.67,3912.67 U101.14@3703,3915
USB_N: j400.A7 j400.B7 U400.4 | length 218.6
  Top Layer w10: U400.4@4545.12,3902.6 4557.91,3902.6 4588.57,3933.25 4636.89,3933.25 4638.76,3931.38 j400.B7@4656.4,3931.38 ; j400.B7@4656.4,3930.47 4657.3,3931.38 4679.99,3931.38 4690.04,3941.43 4690.04,3958.89 4679.99,3968.94 4657.3,3968.94 j400.A7@4656.4,3969.84
USB_P: j400.A6 j400.B6 U400.6 | length 197.9
  Top Layer w10: U400.6@4545.12,3977.4 4557.92,3977.4 4586.07,3949.25 4611.51,3949.25 ; j400.A6@4656.4,3950.16 4655.49,3949.25 4636.95,3949.25 4611.51,3949.25 ; j400.B6@4656.4,3989.53 4655.49,3988.62 4628.62,3988.62 4611.51,3971.51 4611.51,3949.25
USBC_N: U400.3 U401.14 | length 401.4
  Top Layer w28: U401.14@4208.8,3611.4 4212.5,3615.1 4212.5,3634.35 4216.8,3638.65 4216.8,3712.86 4406.54,3902.6 U400.3@4434.88,3902.6
USBC_P: U400.1 U401.13 | length 523.6
  Top Layer w28: U401.13@4258.8,3611.4 4255.1,3615.1 4255.1,3634.35 4250.8,3638.65 4250.8,3698.78 4420.62,3868.6 4463.8,3868.6 4480.47,3885.27 4480.47,3957.33 4461.61,3976.2 4436.09,3976.2 U400.1@4434.88,3977.4
Vin_buck_5V: C203.1 D200.1 D201.1 FB202.2 FB502.1 R201.2 U202.2 | length 4294.2
  Top Layer w20: FB202.2@2990,3501.5 2998.5,3510 3260,3510 3670,3510 3900,3740 3900,4380 3990,4470 3990,4730 ; U202.2@3990,4870 3990,4730 ; FB502.1@4218.5,4730 3990,4730
  Top Layer w25: D201.1@1529,3010 D200.1@1529,3200 1534.75,3205.75 1534.75,3254.75 1590,3310 1800,3310 1900.7,3410.7 R201.2@2120,3410.7 ; R201.2@2150,3410 2500,3410 2730,3640 2840,3640 2972.5,3507.5 2984,3507.5 FB202.2@2990,3501.5
VO: C106.2 C107.2 U100.38 | length 247.1
  Top Layer w6: U100.38@3335.8,3948.5 3337.81,3950.51 3380.51,3950.51 3427.51,3997.51 3456.11,3997.51 C106.2@3458.59,4000 3451.5,4007.09 C107.2@3451.5,4100
Vout_5V: D200.2 pad.4 PS200.4 | length 1284.3
  Top Layer w25: D200.2@1731,3200 1890,3200 2010,3320 pad.4@2420,3320 2660,3320 2806.61,3466.61 PS200.4@2806.61,3564.88
XI: C100.2 U100.37 X100.1 | length 880.8
  Top Layer w6: X100.1@3440.8,4500 3430,4489.2 3430,4383.7 3310,4263.7 3310,4180 3230,4100 3230,3940 3253,3917 U100.37@3335.8,3917 C100.2@3454,3917
XO: C108.2 U100.36 X100.2 | length 1017.2
  Top Layer w6: U100.36@3335.8,3885.5 3374.5,3885.5 3410,3850 C108.2@3451.5,3850 3451.5,3879.83 3455.01,3883.35 3573.35,3883.35 3610,3920 3610,4260 3700,4350 3740,4350 3799.3,4409.3 X100.2@3799.3,4500
pads on no net: 500.5 500.6 500.7 501.1 j400. j400.A8 j400.B8 U100.1 U100.2 U100.21 U100.22 U100.23 U100.24 U100.25 U100.26 U100.30 U100.44 U300.3 U302.3 U303.3 U304.3 U401.4 U401.8 U401.12 U401.15 U401.16 U401.26 U401.28 U401.29 U401.30 U401.32 U401.33 U401.34 U401.35 U401.36 U401.37 U401.38 U401.39 U500.7

## Polygon pours and split planes (outlines as drawn)
DGND on Top Layer "DGND" (solid, pour order 9): 998.2,2750.22 1139.78,2750.22 1140,2750 1390,3000 1390,3280 2044.78,3655.22 2850,3660 2970,3550 3670,3550 3880,3760 3880,4390 3960,4470 3960,5050 4940,5050 4940,2010 3950,2010 3950,2170 3700,2420 3550,2420 3300,2670 3030,2670 2900,2540 2670,2540 2530,2360 2530,2010 1020,2010 1020,2750
AGND on Top Layer "AGND" (solid, remove dead copper, pour order 4): 1020,5050 3940,5050 3940,4470 3840,4370 3840,3750 3660,3570 2970,3570 2865,3675 2005,3675 1340,3300 1340,3010 1120,2800 1020,2800
RGND on Top Layer "RGND" (solid, remove dead copper, pour order 7): 2560,2010 2560,2350 2680,2520 2910,2520 3040,2650 3280,2650 3530,2400 3690,2400 3930,2160 3930,2010
DGND on Bottom Layer "DGND_L02_P014" (solid, remove dead copper, pour order 14): 1020,2750 1139.78,2750.22 1140,2750 1390,3000 1390,3280 2045,3655 2850,3660 2970,3550 3670,3550 3880,3760 3880,4390 3960,4470 3960,5050 4940,5050 4940,2010 3950,2010 3950,2170 3700,2420 3550,2420 3300,2670 3030,2670 2900,2540 2670,2540 2530,2360 2530,2010 1020,2010
AGND on Bottom Layer "AGND_L02_P013" (solid, pour order 13): 1020,5050 3940,5050 3940,4470 3840,4370 3840,3750 3660,3570 2970,3570 2865,3675 2005,3675 1340,3300 1340,3010 1120,2800 1020,2800
RGND on Bottom Layer "RGND_L02_P015" (solid, remove dead copper, pour order 15): 2560,2010 2560,2350 2680,2520 2910,2520 3040,2650 3280,2650 3530,2400 3690,2400 3930,2160 3930,2010

## Other copper
Top Layer:
  region net DGND: 4476.1,3398.8 4633.7,3398.8 4633.7,3241.2 4476.1,3241.2

## Silkscreen, mask and mechanical layers (free items; w line width, h text height)
Top Overlay:
  text "5V_DC" at 2605,3520 h30
  text "N_AC" at 1060,3435 h30 r270
  text "V_AC" at 1210,3435 h30 r270
  text "5V_DC" at 2225,3390 h30
  text "NEUTRO" at 1065,3175 h30
  text "GND_DC" at 2475,3120 h30
  text "VAC_L3" at 1065,3060 h30
  text "GND_DC" at 2610.4,2753.17 h30
  text "EN" at 4819.03,2484.06 h30 r90
  text "BOOT" at 4140.26,2445.62 h30 r90
Bottom Overlay:
  drawing of 38 lines, arcs and shapes, not listed
  text "I_N" at 2095,4990 h30
  text "I_L3" at 2385,4990 h30
  text "I_L2" at 2685,4990 h30
  text "I_L1" at 2955,4990 h30
  text "5V" at 4305,4795 h30 r90
  text "GND" at 4415,4795 h30 r90
  text "3V3" at 4515,4795 h30 r90
  text "D10" at 4625,4795 h30 r90
  text "D9" at 4715,4795 h30 r90
  text "D8" at 4815,4795 h30 r90
  text "D7" at 4925,4795 h30 r90
  text "VAC L3" at 1325,4615 h30 r270
  text "VAC_L1" at 1723.34,4611.66 h30 r270
  text "NEUTRO" at 1138.34,4601.66 h30 r270
  text "VAC_L2" at 1533.34,4601.66 h30 r270
  text "D0" at 4305,4375 h30 r90
  text "D1" at 4415,4375 h30 r90
  text "D2" at 4515,4375 h30 r90
  text "D3" at 4625,4375 h30 r90
  text "D4" at 4715,4375 h30 r90
  text "D5" at 4815,4375 h30 r90
  text "D6" at 4925,4375 h30 r90
  text "Analizador Trifasico IoT" at 4280,3930 h80
  text "UNAL" at 3720,3000 h80
  text "GND" at 2745,2135 h30 r90
  text "A" at 2945,2135 h30 r90
  text "B" at 3155,2135 h30 r90
Board Shape:
  lines w10: 1020,2802.5 1020,2010 4940,2010 4940,5050 1020,5050 1020,4387.5 1020,2802.5 ; 1020,2802.5 1020,2802.5
  lines w30: 1398.1,4718.1 1449.03,4769.03 1449.03,4949.63 ; 1634.46,4940.35 1634.92,4701.48

## Dimensions
1020,2010 to 4940,2010 on Mechanical 5
1020,2010 to 1020,5050 on Mechanical 5

## Text inside footprints (layer, text, board x,y; h text height)
C201: Top Overlay "-" at 1510,2430 h78.7; Top Overlay "+" at 1190,2435 h78.7
C202: Top Overlay "-" at 2270,2430 h78.7; Top Overlay "+" at 1950,2435 h78.7
D203: Top Overlay "+" at 3360,4715 h30 r90
D204: Top Overlay "+" at 3350,3145 h30 r270
D205: Top Overlay "+" at 2310,3005 h30 r270